# Altium PCB R1 pcb.PcbDoc
Units mm, origin at the board's own origin, x right, y up, seen from the top; angles counter-clockwise.
Board outline 112.52 x 131.95 mm, 2 copper layers (Top Layer, Bottom Layer); 29 components, 35 nets, 154 pads, 4 vias.
Unrouted connection lines stored in the file: 3.
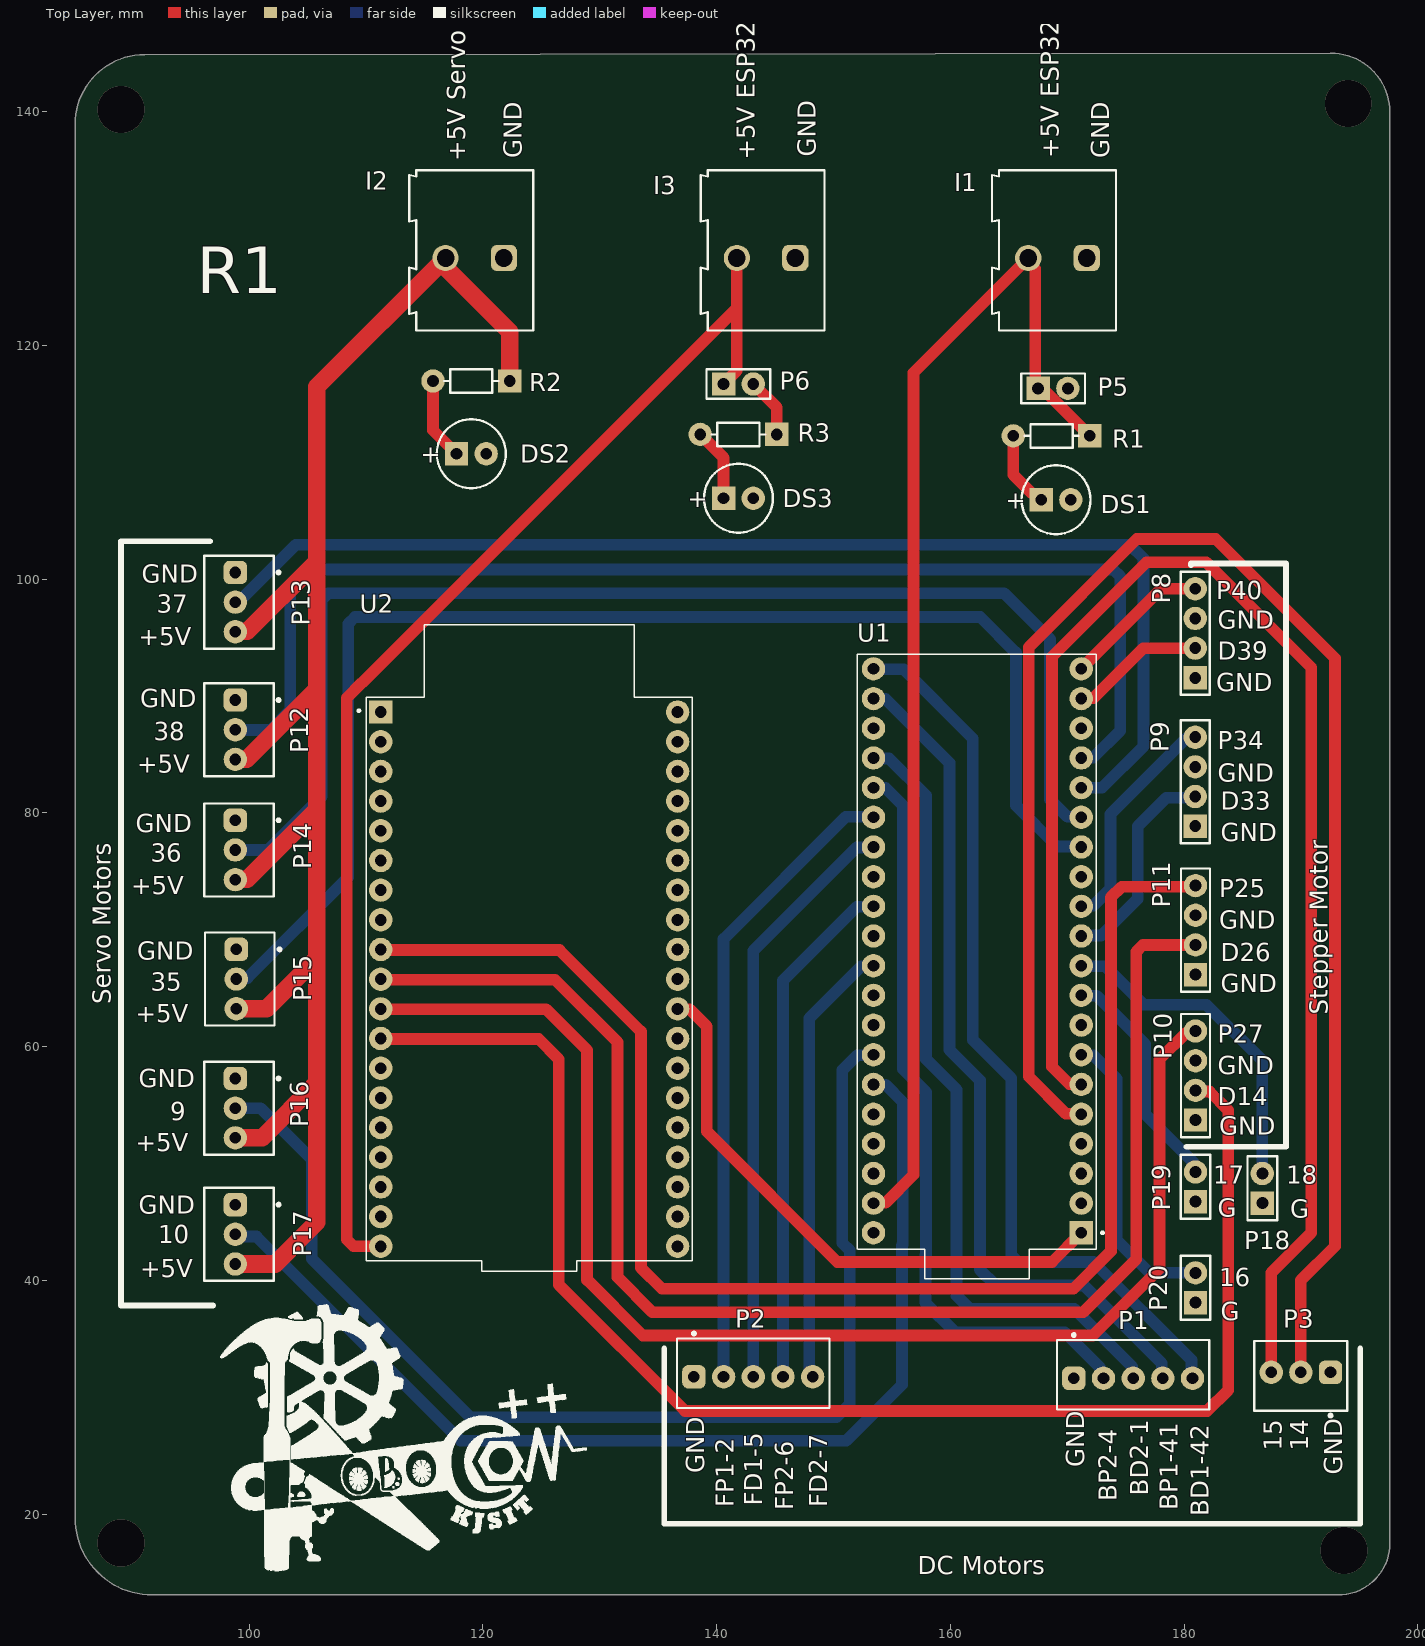
[diagram p0: Top Layer view]
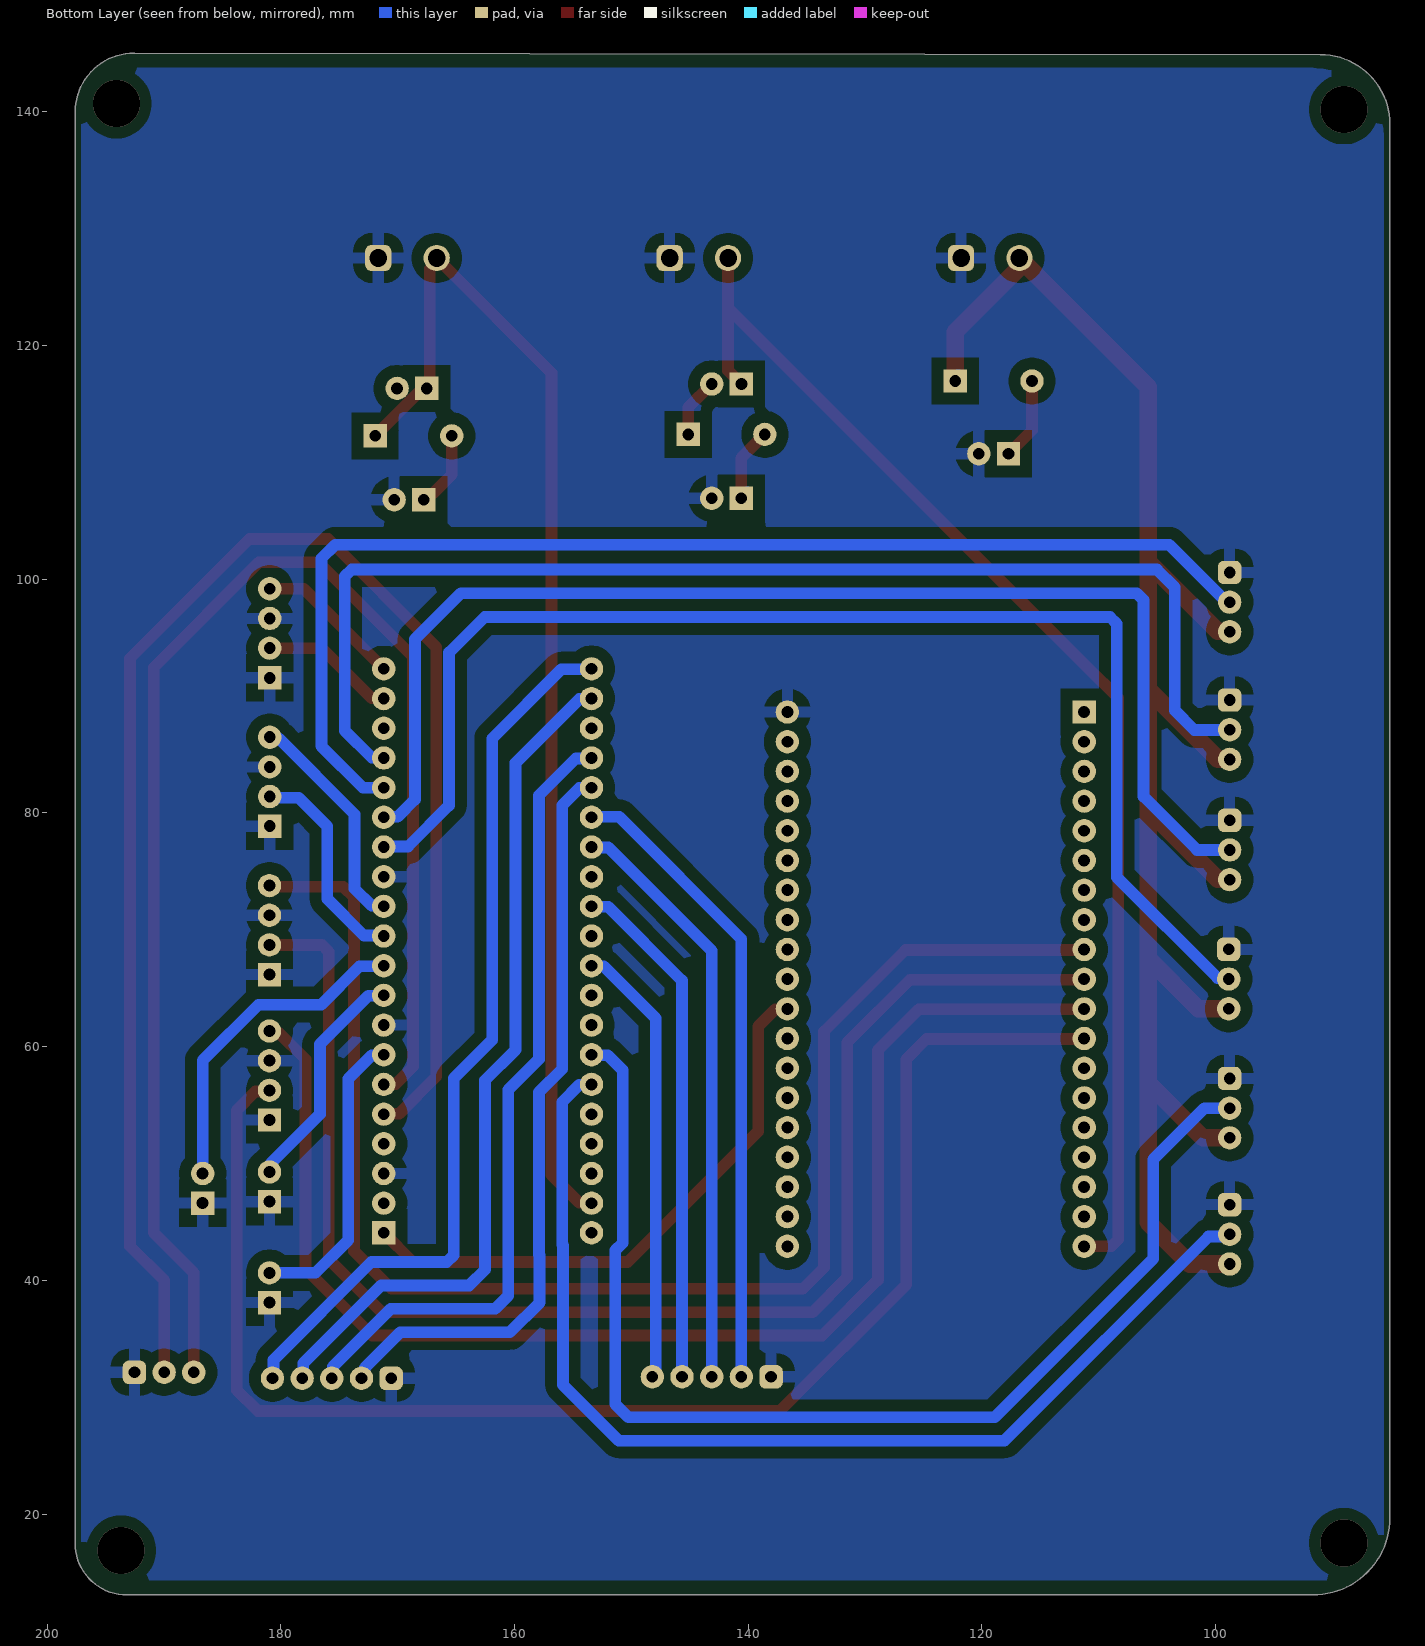
[diagram p1: Bottom Layer view, seen from below]
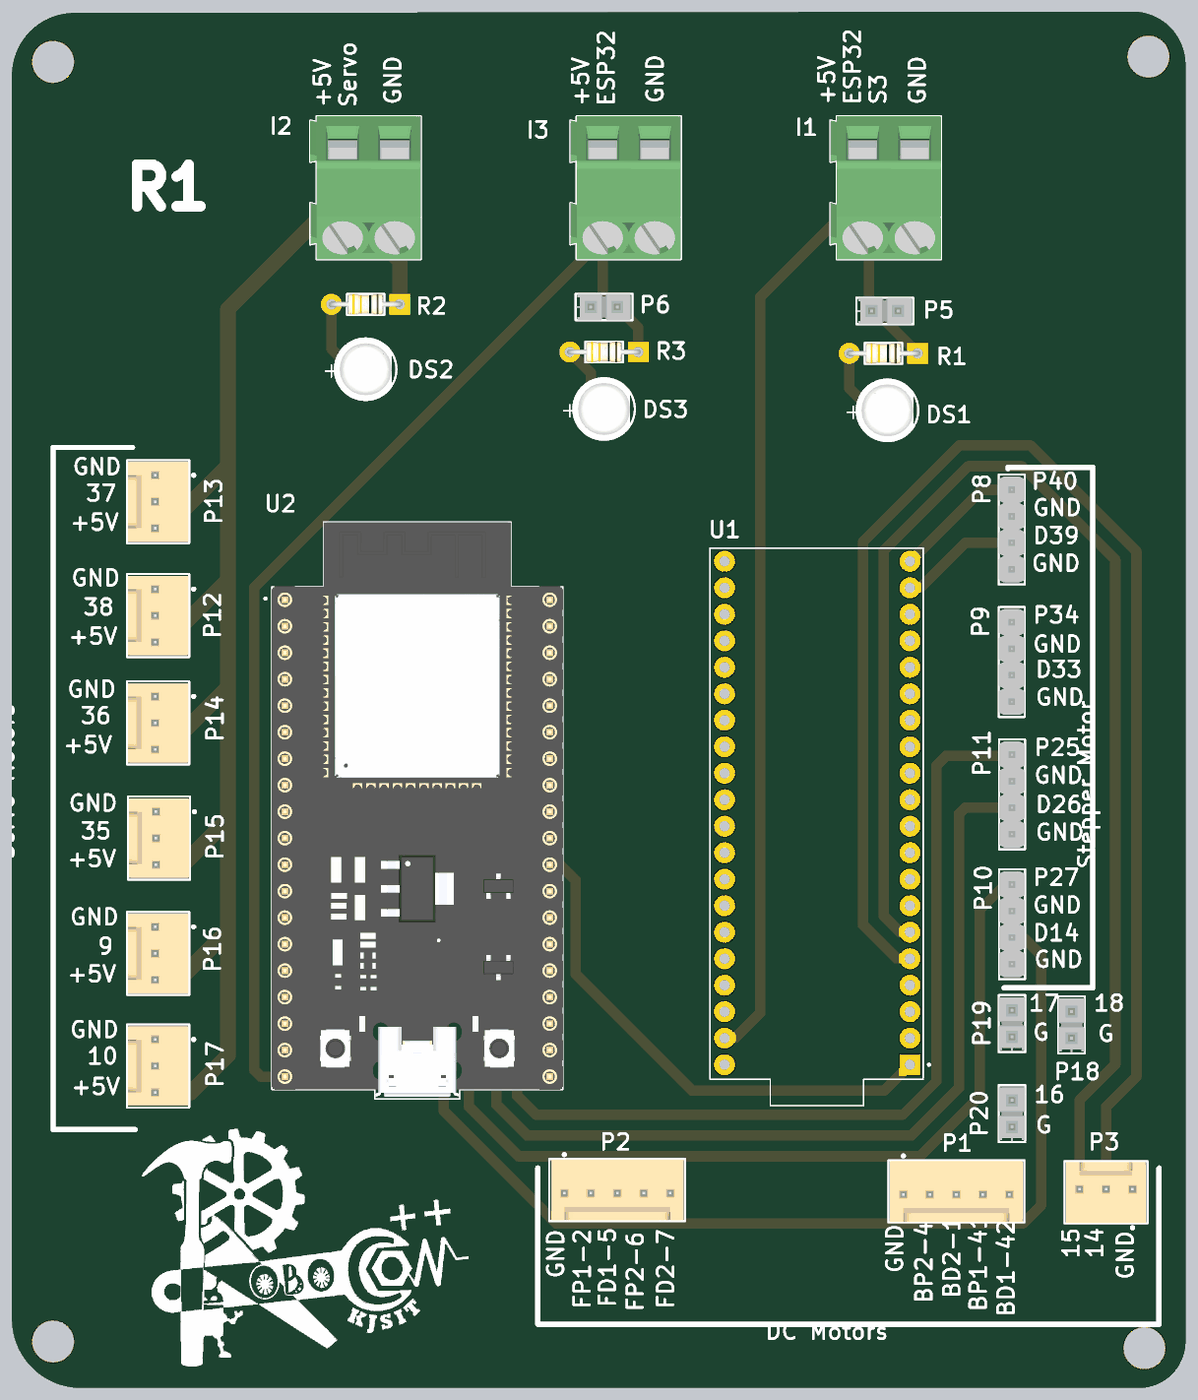
[diagram p2: 3D render of the assembled board from above, using the file's embedded part models]

## Layer stack, top to bottom
Top Solder: solder mask 0.0102, Solder Resist, Dk 3.5
Top Layer: signal copper 0.0356
Dielectric 1: dielectric 0.32, FR-4, Dk 4.8
Bottom Layer: signal copper 0.0356
Bottom Solder: solder mask 0.0102, Solder Resist, Dk 3.5

## Board outline
85.09,138.933 85.09,19.685 ccw(c91.694,19.685) 91.694,13.081 193.167,13.081 ccw(c193.167,17.526) 197.612,17.526 197.612,139.957 ccw(c192.538,139.957) 192.532,145.031 91.049,144.9 ccw(c91.056,138.933)

## Design rules (kind name [scope] priority, off if disabled: settings)
Clearance [All] p1: gap=1 ignorepadtopadclearanceinfootprint=FALSE
PlaneClearance [All] p1: clearance=1
PlaneConnect [All] p1: planeconnectstyle=Relief reliefexpansion=1 reliefentries=4 reliefconductorwidth=1 reliefairgap=1
PolygonConnect [All] p1: connectstyle=Relief reliefconductorwidth=1 reliefentries=4 polygonreliefangle="90 Angle" airgapwidth=1
RoutingVias [All] p1: holewidth=0.711 width=1.27 viastyle="Through Hole" minholewidth=0.711 minwidth=1.27 maxholewidth=0.711 maxwidth=1.27
SolderMaskExpansion [All] p1: expansion=0.102 istentingtop=FALSE
SupplyNets "Schematic Supply Nets" [InNet('GND')] p1: voltage=0.000
Width [All] p1: maxlimit=1.5 minlimit=0.5 preferedwidth=1
28 further rules are at their usual default settings.

## Components (designator, comment, footprint, x,y, rotation, side; value= is the part's Value field where it differs from the comment)
DS1 "WP7113SYD" KING-WP7113SYD_V 169.037,106.807 r0 top
DS2 "WP7113SYD" KING-WP7113SYD_V 118.999,110.744 r0 top
DS3 "WP7113SYD" KING-WP7113SYD_V 141.859,106.934 r0 top
I1 "691211720002" 691211720002 169.164,128.143 r180 top
I2 "691211720002" 691211720002 119.293,128.143 r180 top
I3 "691211720002" 691211720002 144.229,128.143 r180 top
P1 "61900511121" 61900511121 175.641,31.923 r180 top
P2 "61900511121" 61900511121 143.129,32.05 r180 top
P3 "61900311121" 61900311121 189.992,31.831 r0 top
P5 "DW-02-16-G-S-200" SMTC-DW-02-16-X-S-200 167.513,116.332 r0 top
P6 "DW-02-16-G-S-200" SMTC-DW-02-16-X-S-200 140.589,116.713 r0 top
P8 "MTLW-104-07-L-S-125" SMTC-MTLW-104-07-X-S-125 180.95,91.567 r90 top
P9 "MTLW-104-07-L-S-125" SMTC-MTLW-104-07-X-S-125 180.95,78.867 r90 top
P10 "MTLW-104-07-L-S-125" SMTC-MTLW-104-07-X-S-125 180.975,53.721 r90 top
P11 "MTLW-104-07-L-S-125" SMTC-MTLW-104-07-X-S-125 180.975,66.167 r90 top
P12 "61900311121" 61900311121 99.106,87.122 r90 top
P13 "61900311121" 61900311121 99.106,98.044 r90 top
P14 "61900311121" 61900311121 99.106,76.835 r90 top
P15 "61900311121" 61900311121 99.187,65.786 r90 top
P16 "61900311121" 61900311121 99.106,54.737 r90 top
P17 "61900311121" 61900311121 99.106,43.942 r90 top
P18 "DW-02-16-G-S-200" SMTC-DW-02-16-X-S-200 186.69,46.609 r90 top
P19 "DW-02-16-G-S-200" SMTC-DW-02-16-X-S-200 180.975,46.736 r90 top
P20 "DW-02-16-G-S-200" SMTC-DW-02-16-X-S-200 180.975,38.1 r90 top
R1 "CF18JT10K0" FP-CF18-MFG 168.656,112.268 r180 top value=10kΩ
R2 "CF18JT10K0" FP-CF18-MFG 118.999,116.967 r180 top value=10kΩ
R3 "CF18JT10K0" FP-CF18-MFG 141.859,112.395 r180 top value=10kΩ
U1 "ESP32-S3-DEVKITM-1-N8" PCBComponent_1 172.466,105.41 r180 top
U2 "ESP32-DEVKITC" MODULE_ESP32-DEVKITC 123.952,65.786 r0 top

## Footprints (in the part's own frame and the unit in brackets; to place one, negate y for a bottom-side part, rotate by r counter-clockwise, add the part's x,y. Pads: shape width x height; smd on the part's side, far side on the other; paste and mask are expansions set on the pad)
61900311121 [mm] "2.54mm Male Locking Header, 3p"
  rrect50% 2x2 hole 1: 1(2.54,0.3)
  round 2 hole 1: 2(0,0.3) 3(-2.54,0.3)
  silkscreen extent -3.98,-3.52 3.98,2.98, body extent -3.81,-2.9 3.81,2.9, height 11.53
61900511121 [mm] "2.54mm Male Locking Header, 5p"
  rrect50% 2x2 hole 1: 1(5.08,0.3)
  round 2 hole 1: 2(2.54,0.3) 3(0,0.3) 4(-2.54,0.3) 5(-5.08,0.3)
  silkscreen extent -6.52,-3.52 6.52,2.98, body extent -6.35,-2.9 6.35,2.9, height 11.53
691211720002 [mm] "5,00mm - modular - green -45¡ã entry with rising cage clamp - 02p"
  rrect50% 2.25x2.25 hole 1.5: 1(-2.5,0.65)
  round 2.25 hole 1.5: 2(2.5,0.65)
  silkscreen extent -5,-6.85 5.6,6.85, body extent -5,-6.85 5.6,6.85, height 15.72
FP-CF18-MFG [mm]
  rect 2x2 hole 1 paste-2539.97 mask+0: 1(-3.28,0)
  round 2 hole 1 paste-2539.97 mask+0: 2(3.28,0)
  silkscreen extent -2.3,-1 2.3,1, body extent -3.96,-1.1 3.96,1.1, height 0.25
KING-WP7113SYD_V [mm] "THD, 2-Leads, Dia 5.9mm, Body Length 8.6mm"
  rect 2x2 hole 1: 1(-1.27,0)
  round 2 hole 1: 2(1.27,0)
  silkscreen extent -2.95,-2.95 2.95,2.95, body extent -2.95,-2.95 2.5,2.95, height 15.5
MODULE_ESP32-DEVKITC [mm]
  rect 2x2 hole 1.02: 1(-12.7,22.85)
  round 2 hole 1.02: 2(-12.7,20.31) 3(-12.7,17.77) 4(-12.7,15.23) 5(-12.7,12.69) 6(-12.7,10.15) 7(-12.7,7.61) 8(-12.7,5.07) 9(-12.7,2.53) 10(-12.7,-0.01) 11(-12.7,-2.55) 12(-12.7,-5.09) 13(-12.7,-7.63) 14(-12.7,-10.17) 15(-12.7,-12.71) 16(-12.7,-15.25) 17(-12.7,-17.79) 18(-12.7,-20.33) 19(-12.7,-22.87) 20(12.7,-22.87) 21(12.7,-20.33) 22(12.7,-17.79) 23(12.7,-15.25) 24(12.7,-12.71) 25(12.7,-10.17) 26(12.7,-7.63) 27(12.7,-5.09) 28(12.7,-2.55) 29(12.7,-0.01) 30(12.7,2.53) 31(12.7,5.07) 32(12.7,7.61) 33(12.7,10.15) 34(12.7,12.69) 35(12.7,15.23) 36(12.7,17.77) 37(12.7,20.31) 38(12.7,22.85)
  silkscreen extent -14.67,-25 13.95,30.3, body extent -13.97,-24.8 13.97,30.3, height 6.69
PCBComponent_1 [mm]
  rect 2x2 hole 1: J1_1(1.27,61.341)
  round 2 hole 1: J1_2(1.27,58.801) J1_3(1.27,56.261) J1_4(1.27,53.721) J1_5(1.27,51.181) J1_6(1.27,48.641) J1_7(1.27,46.101) J1_8(1.27,43.561) J1_9(1.27,41.021) J1_10(1.27,38.481) J1_11(1.27,35.941) J1_12(1.27,33.401) J1_13(1.27,30.861) J1_14(1.27,28.321) J1_15(1.27,25.781) J1_16(1.27,23.241) J1_17(1.27,20.701) J1_18(1.27,18.161) J1_19(1.27,15.621) J1_20(1.27,13.081) J3_1(19.05,61.341) J3_2(19.05,58.801) J3_3(19.05,56.261) J3_4(19.05,53.721) J3_5(19.05,51.181) J3_6(19.05,48.641) J3_7(19.05,46.101) J3_8(19.05,43.561) J3_9(19.05,41.021) J3_10(19.05,38.481) J3_10(19.05,38.481) J3_11(19.05,35.941) J3_12(19.05,33.401) J3_13(19.05,30.861) J3_14(19.05,28.321) J3_15(19.05,25.781) J3_16(19.05,23.241) J3_17(19.05,20.701) J3_18(19.05,18.161) J3_19(19.05,15.621) J3_20(19.05,13.081)
  silkscreen extent -0.65,11.81 20.45,65.27
SMTC-DW-02-16-X-S-200 [mm] "Low Cost Board Spacer, 1x2 Pins, Vertical, 2.54mm Pitch, Male"
  rect 2x2 hole 1.02: 1(0,0)
  round 2 hole 1.02: 2(2.54,0)
  silkscreen extent -1.46,-1.27 4,1.27, body extent -1.4,-1.27 3.81,1.27, height 8.51
SMTC-MTLW-104-07-X-S-125 [mm] "Terminal Assembly, 1x4 Pins, Vertical, 2.54mm Pitch, Male"
  rect 2x2 hole 1.02: 1(0,0)
  round 2 hole 1.02: 2(2.54,0) 3(5.08,0) 4(7.62,0)
  silkscreen extent -1.46,-1.24 9.08,1.24, body extent -1.27,-1.24 8.89,1.24, height 4.7

## Part data
DS1 DS2 DS3: library part CMP-1757-00003-1, "The Super Bright Yellow Device, 2 V, -40 to 85 degC, 2-Pin THD, RoHS, Tape and Reel", Case\Package=Axial, Max Operating Temperature="155 degC", Min Operating Temperature="-55 degC", Package Quantity=200, Power Rating="250 mW", Resistance="22.1 kohm", Tolerance=1%, Voltage Rating="250 V", ComponentLink1Description=Datasheet, ComponentLink1URL=http://www.kingbrightusa.com/images/catalog/SPEC/WP7113SYD.pdf, DatasheetVersion="Rev. 7B, 01/2015", Length="0.248 inch", Mount="Through Hole", PackageDescription="2-Pin Through Hole Device, Dia 5.9 mm, Body Length 8.6 mm", PackageReference=WP7113SYD, Packaging=Bulk, RoHSCompliant=true
I1 I2 I3: library part CMP-1502-02524-3, "211 Series 5MM Pitch Straight, Pcb Terminal Block, Through Hole, 2 Way", Color=Green, Current=10A, Max Operating Temperature=105°C, Min Operating Temperature=-40°C, Voltage=300V, Connector Type="PCB, Terminal Block", Contact Material=Brass, Contact Plating=Tin, Height=15.5mm, Housing Material=Nylon, Lead Pitch=5mm, Length=13.7mm, Mount="Through Hole", Number of Contacts=2, Number of Levels=1, Number of Pins=2, Number of Positions Per Level=2, Packaging=Box, Pitch=5.0038mm, Plating="Brass, Steel", REACH SVHC=Unknown, RoHS=Compliant, Stripping Length=-7mm, Termination=Screw, Width=10mm, Wire Gauge (Max)=24AWG, Wire Gauge (Min)=12AWG, Wire/Cable Gauge=12AWG
P1 P2: library part CMP-1502-00587-3, "Wr-wtb Series, 2.54MM Pitch 5 Way 1 Row Straight Pcb Header, Through Hole", Color=Beige, Contact Resistance=20mΩ, Current Rating=3A, Flammability Rating="UL94 V-0", Insulation Resistance=1GΩ, Max Operating Temperature=105°C, Min Operating Temperature=-40°C, Operating Supply Voltage=250V, Connector Type="Male Pin", Contact Gender=Male, Contact Material=Copper, Contact Mating Length=7.493mm, Contact Plating=Tin, Fastening Type=Friction, Gender=Male, Height=12.5mm, Housing Material=Nylon, Lead Free="Lead Free", Lead Pitch=2.54mm, Length=12.7mm, Mount="Through Hole", Number of Contacts=5, Number of Pins=5, Number of Positions=5, Number of Rows=1, Orientation=Vertical, Packaging=Bulk, Pitch=2.54mm, RoHS=Compliant, Termination="Through Hole", Voltage Rating=250V, Width=12.74mm
P3 P12 P13 P14 P15 P16 P17: library part CMP-1502-00585-3, "Wr-wtb Series, 2.54MM Pitch 3 Way 1 Row Straight Pcb Header, Through Hole", Color=Beige, Contact Resistance=20mΩ, Current Rating=3A, Flammability Rating="UL94 V-0", Insulation Resistance=1GΩ, Max Operating Temperature=105°C, Min Operating Temperature=-40°C, Operating Supply Voltage=250V, Connector Type="Male Pin", Contact Gender=Male, Contact Material=Copper, Contact Mating Length=7.493mm, Contact Plating=Tin, Fastening Type=Friction, Gender=Male, Height=12.5mm, Housing Material=Nylon, Lead Pitch=2.54mm, Length=7.62mm, Mount="Through Hole", Number of Contacts=3, Number of Pins=3, Number of Positions=3, Number of Rows=1, Orientation=Vertical, Packaging=Bulk, Pitch=2.54mm, RoHS=Compliant, Termination="Through Hole", Voltage Rating=250V, Width=7.66mm
P5 P6 P18 P19 P20: library part CMP-1024-00001-1, "Flexible .025\" SQ Board Stacker, Through-hole, Vertical, -55 to 125 degC, 2.54 mm Pitch, 2-Pin, Male, RoHS", Manufacturer=Samtec, Temperature Range="-55 to 125 degC", ComponentLink1Description="Manufacturer URL", ComponentLink1URL=http://www.samtec.com, ComponentLink2Description=Datasheet, ComponentLink2URL=http://www.samtec.com/documents/webfiles/pdf/DW.PDF, ComponentLink3Description="Package Specification", ComponentLink3URL=http://www.samtec.com/documents/webfiles/cpdf/XW-XX-XX-XXX-X-XXXX-XXX-XX-XXX-MKT1.PDF, DatasheetVersion=F-214, Mounting Technology=Through-hole, Orientation=Vertical, PackageDescription="Low Cost Board Spacer", PackageReference=DW-02-16-X-S-200, PackageVersion="AX, 8/1984", PartNumber=DW-02-16-G-S-200, Pitch="2.54 mm", RoHS=True
P8 P9 P10 P11: library part CMP-1024-00072-1, "Low Profile .025\" SQ Post Header, Through-hole, Vertical, -55 to 125 degC, 2.54 mm Pitch, 4-Pin, Male, RoHS", Manufacturer=Samtec, Temperature Range="-55 to 125 degC", ComponentLink1Description="Manufacturer URL", ComponentLink1URL=http://www.samtec.com, ComponentLink2Description=Datasheet, ComponentLink2URL=http://www.samtec.com/documents/webfiles/pdf/MTLW_TH.PDF, ComponentLink3Description="Package Specification", ComponentLink3URL=http://www.samtec.com/documents/webfiles/cpdf/MTLW-1XX-XX-XX-X-XXX-XX-XX-MKT1.pdf, DatasheetVersion=F-214, Mounting Technology=Through-hole, Orientation=Vertical, PackageDescription="Low Profile Terminal Assembly", PackageReference=MTLW-104-07-X-S-125, PackageVersion="T, 6/1991", PartNumber=MTLW-104-07-L-S-125, Pitch="2.54 mm", RoHS=True
R1 R2 R3: library part CMP-26528-000002-1, "RES 10K OHM 1/8W 5% CF AXIAL", Manufacturer="Stackpole Electronics", Package=CF18, Power Rating=0.125W, Resistance=10kΩ, Temperature="-55°C to +155°C", Temperature Coefficient=0-500ppm/°C, Temperature Range High=+155°C, Temperature Range Low=-55°C, Tolerance=5%, Voltage Rating=250V, Automotive=No, Category=Res, ComponentLink2Description=Datasheet, ComponentLink2URL=http://www.seielect.com/Catalog/SEI-CF_CFM.pdf, Composition="Carbon Film", Device Class L1="Passive Components", Device Class L2=Resistors, Device Class L3="Through-Hole Resistors", Digikey Description="RES 10K OHM 1/8W 5% CF AXIAL", Height=2mm, Ipc Land Pattern Name=RESAD656W65L360D200, Lead Free=Yes, Manufacturer Part Number=CF18JT10K0, Octopart=https://octopart.com/cf18jt10k0-stackpole+electronics-19205642, RoHS=TRUE, Series=CF
U1: library part ESP32-S3-PICO, Package=None, Availability=Unavailable, MF="{'manufacturer': u'Espressif Systems'}", MP=ESP32-S3-DEVKITM-1-N8, Price=None
U2: "ESP32-WROOM-32UE series Transceiver; 802.11 b/g/n (Wi-Fi, WiFi, WLAN), Bluetooth Â® Smart Ready 4.x Dual Mode Evaluation Board", Package=None, Check_prices=https://www.snapeda.com/parts/ESP32-DEVKITC/Espressif+Systems/view-part/?ref=eda, MF="Espressif Systems", MP=ESP32-DEVKITC, SnapEDA_Link=https://www.snapeda.com/parts/ESP32-DEVKITC/Espressif+Systems/view-part/?ref=snap

## Via types
v1: diameter 4, hole 4, Top Layer to Bottom Layer, 4 vias

## Nets (pads, with @x,y where several pads share a name; then routed paths per layer and width w, separated by ;. In a path a pad name is that pad's centre, name@x,y a point inside that pad or via, vN(x,y) a via of type N, cw(c..) or ccw(c..) an arc to the next point about the centre after c; other vN are vias at no path point)
5V_M: I1.2 P5.1 P5.2 R1.1 U1.J3_2 | length 105.5
  Top Layer w1: U1.J3_2 153.456,46.649 154.452,46.649 156.845,49.042 156.845,117.674 166.41,127.239 I1.2 166.664,127.155 167.259,126.56 167.259,116.586 167.788,116.057 168.147,116.057 R1.1
  Bottom Layer w1: U1.J3_2@153.376,46.649 U1.J3_2 ; P5.2 P5.2@170.147,116.238 ; R1.1@171.436,112.768 R1.1
5V_M2: I3.2 P6.1 P6.2 R3.1 U2.19 | length 113.5
  Top Layer w1: U2.19@111.648,42.916 108.917,42.916 108.331,43.502 108.331,89.836 109.631,91.136 109.678,91.136 141.729,123.187 ; P6.1 141.729,117.853 141.729,123.187 ; I3.2 141.729,123.187 ; P6.2 145.139,114.703 R3.1
5V_S: I2.2 P12.3 P13.3 P14.3 P15.3 P16.3 P17.3 R2.1 | length 154.7
  Top Layer w1.5: P17.3 102.235,41.402 105.791,44.958 105.791,56.896 ; P16.3 101.092,52.197 105.791,56.896 ; P14.3 98.846,74.335 99.842,74.335 105.771,80.264 105.791,80.264 ; P12.3 99.802,84.582 105.791,90.571 105.791,90.678 ; P13.3 98.846,95.544 99.842,95.544 105.517,101.219 105.791,101.219 ; P15.3 101.473,63.246 105.791,67.564 ; R2.1 122.279,121.18 116.937,126.522 116.937,127.349 I2.2 105.791,116.491 105.791,101.219 ; 105.791,56.896 105.791,67.564 ; 105.791,67.564 105.791,80.264 ; 105.791,80.264 105.791,90.678 ; 105.791,90.678 105.791,101.219
  Bottom Layer w1.5: R2.1@122.029,117.217 R2.1
Back_dir_1: P1.5 U1.J3_20 | length 77.5
  Bottom Layer w1: U1.J3_20 153.456,92.289 155.996,92.289 161.916,86.369 161.916,60.578 165.206,57.288 165.206,42.155 165.792,41.569 172.248,41.569 180.625,33.192 180.625,31.465 P1.5@180.721,31.369
Back_dir_2: P1.3 U1.J3_17 | length 68.5
  Bottom Layer w1: U1.J3_17 153.456,84.669 154.74,84.669 157.916,81.493 157.916,58.921 160.528,56.309 160.528,38.686 161.645,37.569 170.591,37.569 175.545,32.615 175.545,31.465 P1.3@175.641,31.369
Back_pwm_1: P1.4 U1.J3_19 | length 73.7
  Bottom Layer w1: U1.J3_19 153.456,89.749 154.452,89.749 159.916,84.285 159.916,59.75 162.528,57.138 162.528,40.926 163.885,39.569 171.42,39.569 178.085,32.903 178.085,31.465 P1.4@178.181,31.369
Back_pwm_2: P1.2 U1.J3_16 | length 65.1
  Bottom Layer w1: U1.J3_16 153.456,82.129 154.452,82.129 155.916,80.665 155.916,58.093 157.916,56.093 157.916,42.205 157.861,42.15 157.861,38.1 160.401,35.56 169.772,35.56 172.811,32.521 172.811,31.794 173.101,31.504 P1.2@173.101,31.369
DIR1: P10.2 U2.12 | length 125.2
  Top Layer w1: U2.12@111.252,60.736 111.332,60.656 124.764,60.656 126.492,58.928 126.492,39.624 137.287,28.829 181.991,28.829 183.769,30.607 183.769,54.568 182.176,56.162 181.074,56.162 P10.2
DIR2: P11.2 U2.10 | length 121.7
  Top Layer w1: U2.10@111.292,65.736 126.161,65.736 131.517,60.38 131.517,40.256 134.49,37.283 171.36,37.283 175.895,41.818 175.895,68.121 176.481,68.707 P11.2
DIR3: P9.2 U1.J1_11 | length 18.3
  Bottom Layer w1: U1.J1_11 171.236,69.509 172.887,69.509 176.022,72.644 176.022,78.867 178.463,81.308 180.85,81.308 P9.2
DIR4: P8.2 U1.J1_19 | length 11.5
  Top Layer w1: U1.J1_19 171.236,89.829 172.232,89.829 176.51,94.107 P8.2
extra_dir_pin: P3.3 U1.J1_6 | length 129.2
  Top Layer w1: U1.J1_6 171.156,56.809 170.16,56.809 168.696,58.273 168.696,93.365 176.778,101.447 181.886,101.447 190.881,92.452 190.881,44.069 187.452,40.64 P3.3
extra_pwm_pin: P3.2 U1.J1_5 | length 139.2
  Top Layer w1: U1.J1_5 171.156,54.269 169.872,54.269 166.696,57.445 166.696,94.193 175.95,103.447 182.714,103.447 192.913,93.248 192.913,42.926 189.992,40.005 P3.2
Front_dir_1: P2.3 U1.J3_14 | length 50.4
  Bottom Layer w1: P2.3 143.129,68.199 151.979,77.049 153.376,77.049 U1.J3_14
Front_dir_2: P2.5 U1.J3_10 | length 38.3
  Bottom Layer w1: P2.5@148.051,31.582 148.113,31.644 148.113,31.981 147.919,32.175 147.919,62.428 152.38,66.889 153.376,66.889 U1.J3_10@153.416,66.929
Front_pwm_1: P2.2 U1.J3_15 | length 54.8
  Bottom Layer w1: P2.2@140.589,31.546 140.589,69.215 151.043,79.669 153.376,79.669 U1.J3_15
Front_pwm_2: P2.4 U1.J3_12 | length 44.3
  Bottom Layer w1: P2.4 145.669,65.659 151.979,71.969 153.376,71.969 U1.J3_12
GND: DS1.2 DS2.2 DS3.2 I1.1 I2.1 I3.1 P1.1 P2.1 P3.1 P8.1 P8.3 P9.1 P9.3 P10.1 P10.3 P11.1 P11.3 P12.1 P13.1 P14.1 P15.1 P16.1 P17.1 P18.1 P19.1 P20.1 U1.J1_3 U1.J1_8 U1.J1_13 U1.J1_18 U2.38
NetDS1_1: DS1.1 R1.2 | length 6.8
  Top Layer w1: R1.2 165.376,108.944 167.013,107.307 167.267,107.307 167.709,106.865 DS1.1@167.709,106.611
NetDS2_1: DS2.1 R2.2 | length 7.1
  Top Layer w1: R2.2 115.719,112.754 DS2.1
NetDS3_1: DS3.1 R3.2 | length 7
  Top Layer w1: R3.2 140.589,110.385 DS3.1
  Bottom Layer w1: DS3.1@140.089,107.434 DS3.1
PN1: P20.2 U1.J1_7 | length 25.6
  Bottom Layer w1: U1.J1_7 171.236,59.269 172.232,59.269 174.244,57.257 174.244,43.434 177.038,40.64 P20.2
PN2: P19.2 U1.J1_9 | length 19.9
  Bottom Layer w1: U1.J1_9 171.236,64.349 172.506,64.349 176.657,60.198 176.657,54.229 180.87,50.016 180.87,49.381 P19.2
PN3: P18.2 U1.J1_10 | length 28.5
  Bottom Layer w1: U1.J1_10 171.236,66.889 173.268,66.889 176.556,63.601 181.911,63.601 186.69,58.822 P18.2
Pulse1: P10.4 U2.11 | length 114.2
  Top Layer w1: U2.11@111.175,63.196 125.399,63.196 128.905,59.69 128.905,40.039 133.661,35.283 172.188,35.283 177.895,40.99 177.895,58.917 180.219,61.242 180.876,61.242 P10.4
Pulse2: P11.4 U2.9 | length 125.6
  Top Layer w1: U2.9 111.292,68.276 126.542,68.276 133.517,61.301 133.517,41.084 135.318,39.283 139.801,39.283 ; 139.801,39.283 170.531,39.283 173.736,42.488 173.736,72.771 174.653,73.688 180.876,73.688 P11.4
Pulse3: P9.4 U1.J1_12 | length 19.5
  Bottom Layer w1: U1.J1_12 171.236,72.049 172.232,72.049 173.696,73.513 173.696,79.89 180.194,86.388 180.85,86.388 P9.4
Pulse4: P8.4 U1.J1_20 | length 12.6
  Top Layer w1: U1.J1_20 178.054,99.187 P8.4
S1: P12.2 U1.J1_17 | length 105.4
  Bottom Layer w1: P12.2 98.831,87.097 101.829,87.097 103.505,88.773 103.505,99.314 105.029,100.838 173.944,100.838 174.53,100.252 174.53,87.047 172.232,84.749 171.236,84.749 U1.J1_17
S2: P13.2 U1.J1_16 | length 103
  Bottom Layer w1: P13.2@98.933,97.917 103.981,102.965 175.341,102.965 176.53,101.776 176.53,85.725 172.974,82.169 U1.J1_16
S3: P14.2 U1.J1_15 | length 107.3
  Bottom Layer w1: P14.2 101.6,76.835 106.172,81.407 106.172,98.22 106.758,98.806 164.592,98.806 168.529,94.869 168.529,81.153 170.013,79.669 171.156,79.669 U1.J1_15
S4: P15.2 U1.J1_14 | length 113.7
  Bottom Layer w1: P15.2 98.983,65.882 99.844,65.882 108.458,74.495 108.458,96.188 109.044,96.774 162.56,96.774 165.608,93.726 165.608,80.645 169.124,77.129 171.156,77.129 U1.J1_14
S5: P16.2 U1.J3_7 | length 101
  Bottom Layer w1: P16.2 100.965,54.737 105.35,50.352 105.35,41.843 118.907,28.286 150.255,28.286 151.384,29.415 151.384,42.565 150.749,43.2 150.749,57.999 152.019,59.269 153.376,59.269 U1.J3_7
S6: P17.2 U1.J3_6 | length 93.8
  Bottom Layer w1: P17.2@98.778,44.105 98.913,44.105 99.268,43.751 100.614,43.751 118.079,26.286 151.084,26.286 155.861,31.063 155.861,42.978 155.916,43.033 155.916,55.265 154.452,56.729 153.456,56.729 U1.J3_6
UART: U1.J1_1 U2.28 | length 49.9
  Top Layer w1: U2.28@136.525,63.196 137.688,63.196 139.152,61.732 139.152,52.745 150.328,41.569 168.696,41.569 U1.J1_1
pads on no net: U1.J1_2 U1.J1_4 U1.J3_1 U1.J3_3 U1.J3_4 U1.J3_5 U1.J3_8 U1.J3_9 U1.J3_11 U1.J3_13 U1.J3_18 U2.1 U2.2 U2.3 U2.4 U2.5 U2.6 U2.7 U2.8 U2.13 U2.14 U2.15 U2.16 U2.17 U2.18 U2.20 U2.21 U2.22 U2.23 U2.24 U2.25 U2.26 U2.27 U2.29 U2.30 U2.31 U2.32 U2.33 U2.34 U2.35 U2.36 U2.37
copper on no net: | length 0
  other v1: 193.675,16.891 89.027,17.526 89.027,140.208 194.056,140.716

## Polygon pours and split planes (outlines as drawn)
GND on Bottom Layer "GND_L02_P000" (solid, pour order 0): 85.598,143.764 194.564,143.764 cw(c194.564,141.224) 197.104,141.224 197.104,16.891 cw(c194.564,16.891) 194.564,14.351 88.138,14.351 cw(c88.138,16.891) 85.598,16.891 85.598,137.668 cw(c91.672,137.668) 91.672,143.742

## Silkscreen, mask and mechanical layers (free items; w line width, h text height)
Top Overlay:
  drawing of 33 lines, arcs and shapes, not listed
  text "GND" at 148.463,136.144 h1.52 r90
  text "GND" at 123.317,136.017 h1.52 r90
  text "+5V ESP32 S3" at 169.291,136.017 h1.52 r90
  text "GND" at 173.609,136.017 h1.52 r90
  text "+5V ESP32" at 143.256,135.89 h1.52 r90
  text "+5V Servo" at 118.491,135.763 h1.52 r90
  text "R1" at 95.504,124.46 h4
  text "GND" at 90.805,99.695 h1.52
  text "P40" at 182.753,98.298 h1.52
  text "37" at 92.075,97.155 h1.52
  text "GND" at 182.88,95.758 h1.52
  text "+5V" at 90.551,94.361 h1.52
  text "D39" at 182.88,93.091 h1.52
  text "GND" at 182.753,90.424 h1.52
  text "GND" at 90.678,89.027 h1.52
  text "38" at 91.821,86.233 h1.52
  text "P34" at 182.88,85.471 h1.52
  text "+5V" at 90.424,83.439 h1.52
  text "GND" at 182.88,82.677 h1.52
  text "D33" at 183.134,80.264 h1.52
  text "GND" at 90.297,78.359 h1.52
  text "GND" at 183.134,77.597 h1.52
  text "36" at 91.567,75.819 h1.52
  text "+5V" at 89.916,73.025 h1.52
  text "P25" at 183.007,72.771 h1.52
  text "GND" at 183.007,70.104 h1.52
  text "GND" at 90.424,67.437 h1.52
  text "D26" at 183.134,67.31 h1.52
  text "35" at 91.567,64.77 h1.52
  text "GND" at 183.134,64.643 h1.52
  text "Servo Motors" at 88.138,63.627 h1.52 r90
  text "Stepper Motor" at 192.278,62.738 h1.52 r90
  text "+5V" at 90.297,62.103 h1.52
  text "P27" at 182.88,60.325 h1.52
  text "GND" at 182.88,57.658 h1.52
  text "GND" at 90.551,56.515 h1.52
  text "D14" at 182.88,54.991 h1.52
  text "9" at 93.218,53.721 h1.52
  text "GND" at 183.007,52.451 h1.52
  text "+5V" at 90.297,51.054 h1.52
  text "17" at 182.499,48.26 h1.52
  text "18" at 188.722,48.26 h1.52
  text "GND" at 90.551,45.72 h1.52
  text "G" at 182.88,45.466 h1.52
  text "G" at 189.103,45.339 h1.52
  text "10" at 92.202,43.18 h1.52
  text "+5V" at 90.678,40.259 h1.52
  text "16" at 183.007,39.497 h1.52
  text "G" at 183.134,36.576 h1.52
  text "15" at 188.341,25.4 h1.52 r90
  text "14" at 190.627,25.4 h1.52 r90
  text "GND" at 171.45,24.003 h1.52 r90
  text "GND" at 138.938,23.495 h1.52 r90
  text "GND" at 193.548,23.368 h1.52 r90
  text "BD2-1" at 176.911,21.59 h1.52 r90
  text "BP2-4" at 174.244,21.082 h1.52 r90
  text "FD1-5" at 143.891,20.701 h1.52 r90
  text "FP1-2" at 141.478,20.574 h1.52 r90
  text "FD2-7" at 149.479,20.574 h1.52 r90
  text "FP2-6" at 146.558,20.32 h1.52 r90
  text "BP1-41" at 179.451,20.32 h1.52 r90
  text "BD1-42" at 182.118,19.812 h1.52 r90
  text "DC Motors" at 157.226,14.859 h1.52

## Text inside footprints (layer, text, board x,y; h text height)
DS1: Top Overlay "+" at 164.719,106.045 h1.5
DS2: Top Overlay "+" at 114.681,109.982 h1.5
DS3: Top Overlay "+" at 137.541,106.172 h1.5